# Altium PCB V3.2_Board.PcbDoc (part 6 of 9)
Units mil, origin at the board's own origin, x right, y up, seen from the top; angles counter-clockwise.
Board outline 7795.28 x 4881.89 mil, 2 copper layers (Top Layer, Bottom Layer), stack 57 mil thick; 419 components, 273 nets, 1244 pads, 414 vias.
Unrouted connection lines stored in the file: 3.
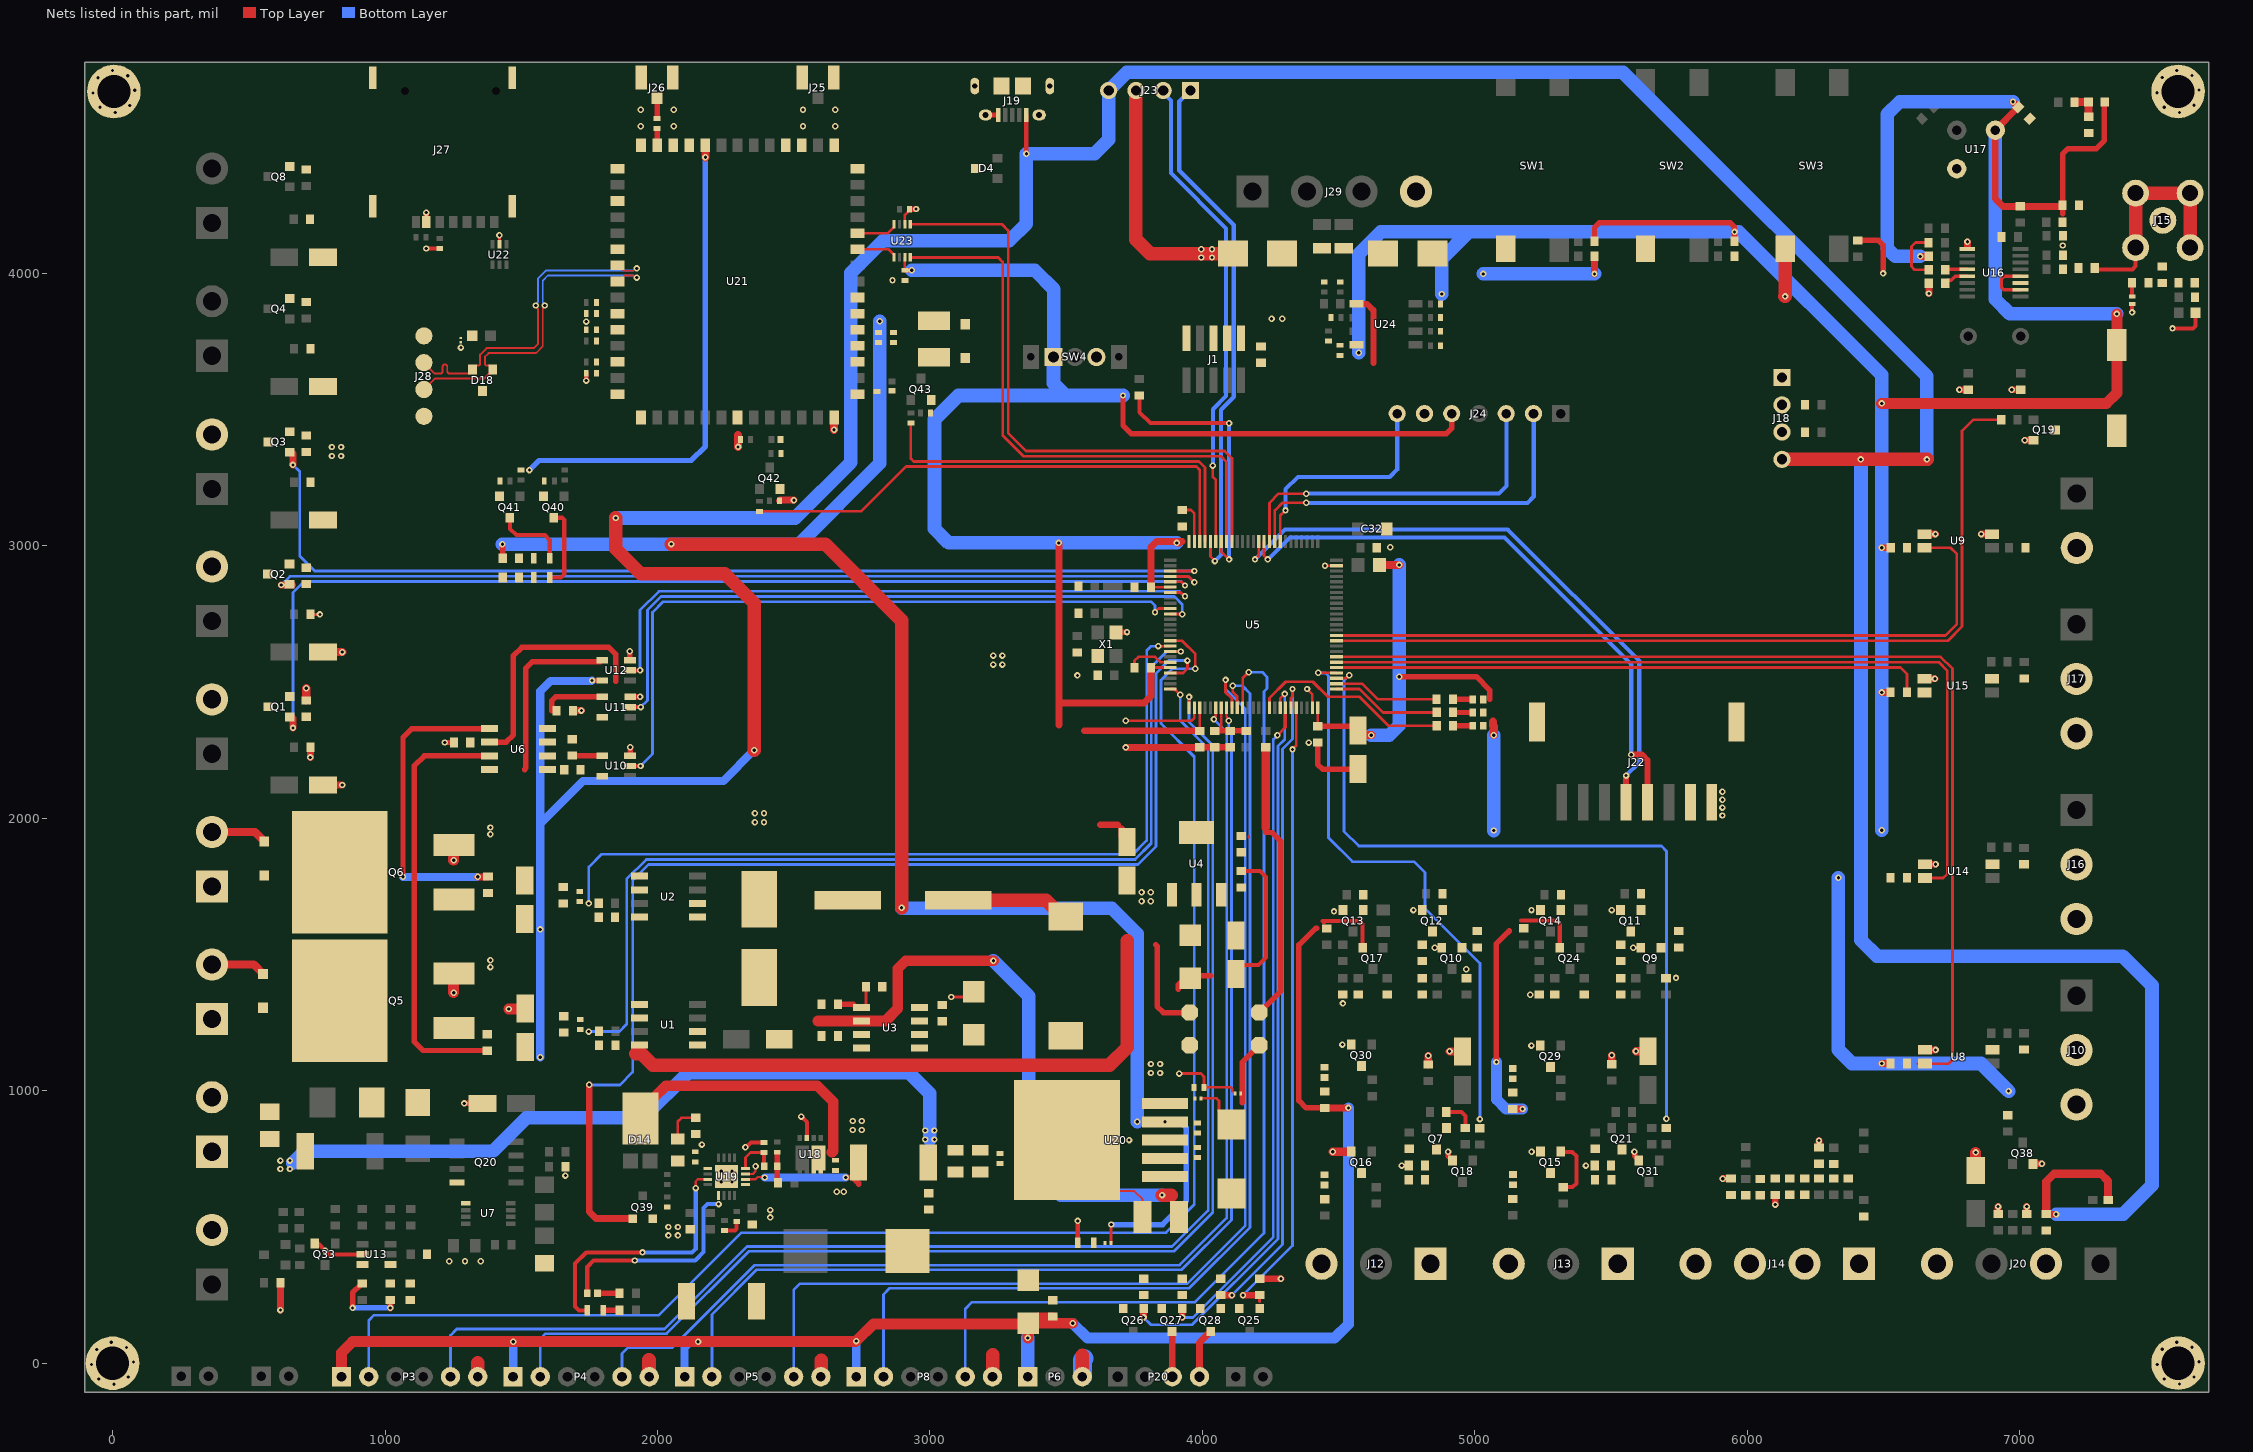
[diagram p3: the nets of this part, all layers, seen from the top]

## Part data (continued)
U6: "IC GATE DRVR LOW-SIDE 8SOIC", Case/Package=SOIC, Manufacturer="ON Semiconductor", Max Operating Temperature=140°C, Max Output Current=5A, Max Supply Current=3mA, Max Supply Voltage=20V, Min Operating Temperature=-40°C, Min Supply Voltage=4.5V, Supplier Part Number 1=NCP81071ADR2GOSDKR-ND, Category="Gate Drivers", Channel Type=Independent, ComponentLink1Description=https://datasheet.ciiva.com/48511/ncp81071-d-48511319.pdf?src-supplier=Avnet, ComponentLink1URL=https://datasheet.ciiva.com/48511/ncp81071-d-48511319.pdf?src-supplier=Avnet, Height=1.5mm, Lead Free="Lead Free", Length=5mm, Manufacturer Part Number=NCP81071ADR2G, Mount="Surface Mount", Number of Drivers=2, Number of Outputs=2, Number of Pins=8, Packaging="Cut Tape", Pricing 1="1=1.40000, 10=1.25100, 25=1.18720, 100=0.97520, 250=0.91160, 500=0.80560, 1000=0.70000 (USD)", REACH SVHC="No SVHC", RoHS=Yes, RoHS Compliant=Yes, Supplier 1=Digi-Key, Width=4mm
U7: "IC OR CTRLR N+1 8MSOP", Case/Package=MSOP, Manufacturer="Analog Devices / Linear Technology", Max Operating Temperature=70°C, Max Output Current=180mA, Max Supply Voltage=80V, Min Operating Temperature=0°C, Min Supply Voltage=4V, Operating Supply Current=150uA, Package Quantity=50, Supplier Part Number 1=584-LTC4359CMS8#PBF, Category="Power Management ICs", ComponentLink1Description=https://datasheet.ciiva.com/6609/4359fb-6609306.pdf?src-supplier=Digi-Key, ComponentLink1URL=https://datasheet.ciiva.com/6609/4359fb-6609306.pdf?src-supplier=Digi-Key, Lead Free="Lead Free", Manufacturer Part Number=LTC4359CMS8#PBF, Number of Drivers=1, Number of Pins=8, Packaging=Rail/Tube, Pricing 1="1=4.95000, 10=4.44000, 50=4.19000, 100=3.63000, 1000=3.09000, 10000=3.09000 (USD)", RoHS=Yes, Stock 1=57, Supplier 1=Mouser, Turn-Off Delay Time=300ns, Turn-On Delay Time=200us
U8 U9 U14 U15: "TransistorOptocouplers DC 1 2500Vrms SOP-4_P1.27 Optocouplers RoHS", Case/Package=SOIC, Collector Emitter Saturation Voltage=300mV, Forward Voltage=1.2V, Manufacturer=CEL, Max Collector Current=30mA, Max Operating Temperature=100°C, Max Output Voltage=80V, Max Power Dissipation=120mW, Min Operating Temperature=-55°C, Package Quantity=1, Supplier Part Number 1=PS2801C-1-F3-ACT-ND, Collector Emitter Voltage (VCEO)=300mV, ComponentLink1Description=http://www.cel.com/pdf/datasheets/PS2801C-1,PS2801C-4.pdf?src-supplier=Digi-Key, ComponentLink1URL=http://www.cel.com/pdf/datasheets/PS2801C-1,PS2801C-4.pdf?src-supplier=Digi-Key, ComponentLink2Description=http://www.cel.com/pdf/datasheets/how_to_order_optos.pdf?src-supplier=Digi-Key, ComponentLink2URL=http://www.cel.com/pdf/datasheets/how_to_order_optos.pdf?src-supplier=Digi-Key, ComponentLink3Description=http://datasheet.iiic.cc/cel/PS2801C-1-F3-A.pdf?src-supplier=IIIC, ComponentLink3URL=http://datasheet.iiic.cc/cel/PS2801C-1-F3-A.pdf?src-supplier=IIIC, Lead Free="Lead Free", Manufacturer Part Number=PS2801C-1-F3-A, Mount="Surface Mount", Number of Channels=1, Number of Pins=4, Output Current per Channel=30mA, Packaging="Tape and Reel", Pricing 1="1=0.77, 10=0.595, 100=0.3825 (USD)", Stock 1=399, Supplier 1=Digi-Key
U10 U11 U12: "IC BUF NON-INVERT 5.5V SOT23-5", Case/Package=SOT-23-5, High Level Output Current=-8mA, Low Level Output Current=8mA, Manufacturer="Texas Instruments", Max Operating Temperature=125°C, Max Supply Voltage=5.5V, Min Operating Temperature=-40°C, Min Supply Voltage=1.6V, Package Quantity=3000, Quiescent Current=1uA, Supplier Part Number 1=296-37176-6-ND, ComponentLink1Description=http://www.ti.com/lit/pdf/sdyu001?src-supplier=Digi-Key, ComponentLink1URL=http://www.ti.com/lit/pdf/sdyu001?src-supplier=Digi-Key, ComponentLink2Description=http://www.ti.com/lit/ds/symlink/sn74lv1t34.pdf?src-supplier=Avnet, ComponentLink2URL=http://www.ti.com/lit/ds/symlink/sn74lv1t34.pdf?src-supplier=Avnet, Lead Free="Lead Free", Logic Function=Buffer,Inverting, Manufacturer Part Number=SN74LV1T34DBVR, Mount="Surface Mount", Number of Bits=1, Number of Bits per Element=1, Number of Channels=1, Number of Elements=1, Number of Input Lines=1, Number of Inputs=1, Number of Output Lines=1, Number of Outputs=1, Number of Pins=5, Operating Supply Current=8mA, Packaging="Tape and Reel", Polarity=Non-Inverting, Pricing 1="1=0.43, 10=0.349, 25=0.3192, 100=0.2374, 250=0.2152, 500=0.17808, 1000=0.13356 (USD)", Propagation Delay=15.5ns, Radiation Hardening=No, REACH SVHC="No SVHC", RoHS Compliant=Yes, Stock 1=37360, Supplier 1=Digi-Key, Weight=0.000353oz
U13: "SOT-23-6 Comparators ROHS", Case/Package=SOT, Manufacturer="Texas Instruments", Max Operating Temperature=125°C, Max Supply Voltage=18V, Min Operating Temperature=-40°C, Min Supply Voltage=1.8V, Nominal Supply Current=7uA, Number of Voltages Monitored=2, Operating Supply Current=5.5uA, Package Quantity=3000, Quiescent Current=11uA, Supplier Part Number 1=595-TPS3700DDCR, Undervoltage Threshold=1.7V, Category=Comparators, ComponentLink1Description=https://datasheet.ciiva.com/15106/getdatasheetpartid-496993-15106246.pdf?src-supplier=Verical, ComponentLink1URL=https://datasheet.ciiva.com/15106/getdatasheetpartid-496993-15106246.pdf?src-supplier=Verical, ComponentLink2Description=https://datasheet.ciiva.com/22693/1882693-22693543.pdf?src-supplier=Element14, ComponentLink2URL=https://datasheet.ciiva.com/22693/1882693-22693543.pdf?src-supplier=Element14, ComponentLink3Description=https://datasheet.ciiva.com/6625/tps3700-6625126.pdf?src-supplier=Digi-Key, ComponentLink3URL=https://datasheet.ciiva.com/6625/tps3700-6625126.pdf?src-supplier=Digi-Key, ComponentLink4Description=https://datasheet.ciiva.com/6625/tps3700-6625125.pdf?src-supplier=Digi-Key, ComponentLink4URL=https://datasheet.ciiva.com/6625/tps3700-6625125.pdf?src-supplier=Digi-Key, ComponentLink5Description=https://datasheet.ciiva.com/6625/tps3700-6625129.pdf?src-supplier=Digi-Key, ComponentLink5URL=https://datasheet.ciiva.com/6625/tps3700-6625129.pdf?src-supplier=Digi-Key, ComponentLink6Description=https://datasheet.ciiva.com/14204/tps3700-14204199.pdf?src-supplier=Avnet, ComponentLink6URL=https://datasheet.ciiva.com/14204/tps3700-14204199.pdf?src-supplier=Avnet, Hysteresis=5.5mV, Lead Free="Lead Free", Manufacturer Part Number=TPS3700DDCR, Mount="Surface Mount", Number of Channels=1, Number of Elements=2, Number of Pins=6, Packaging="Tape and Reel", Pricing 1="1=2.75000, 10=2.48000, 25=2.34000, 50=2.34000, 100=2.00000, 250=1.87000, 500=1.64000, 1000=1.36000, 3000=1.35000, 10000=1.35000 (USD)", Propagation Delay=29us, Radiation Hardening=No, REACH SVHC="No SVHC", RoHS=Yes, RoHS Compliant=Yes, Series=TPS3700, Supplier 1=Mouser, Supply Current=7uA, Watchdog Timer=No
U16: "RF RX ASK/OOK 300-450MHZ 16QSOP", Case/Package=QSOP, Current - Receiving=6mA, Frequency=450MHz, Manufacturer=Microchip, Max Operating Temperature=105°C, Max Supply Voltage=3.6V, Min Frequency=300MHz, Min Operating Temperature=-40°C, Min Supply Voltage=3V, Nominal Supply Current=4.3mA, Operating Frequency="300 MHz to 450 MHz", Package Quantity=98, Bandwidth=330kHz, Category="Interface ICs", ComponentLink1Description=https://datasheet.ciiva.com/2798/micrf220-2798468.pdf?src-supplier=Digi-Key, ComponentLink1URL=https://datasheet.ciiva.com/2798/micrf220-2798468.pdf?src-supplier=Digi-Key, ComponentLink2Description=https://datasheet.ciiva.com/30475/0900766b81133813-30475820.pdf?src-supplier=RSComponents, ComponentLink2URL=https://datasheet.ciiva.com/30475/0900766b81133813-30475820.pdf?src-supplier=RSComponents, ComponentLink3Description=https://datasheet.ciiva.com/1164/micrf220-1164232.pdf?src-supplier=Element14, ComponentLink3URL=https://datasheet.ciiva.com/1164/micrf220-1164232.pdf?src-supplier=Element14, Data Rate=20Kbps, Depth=3.91mm, Height=1.47mm, Lead Free="Lead Free", Length=4.9mm, Manufacturer Part Number=MICRF220AYQS, Max Frequency=450MHz, Mount="Surface Mount", Number of Pins=16, Packaging=Rail/Tube, Pricing 1="1=2.15000 (USD)", Radiation Hardening=No, REACH SVHC="No SVHC", RoHS=Yes, RoHS Compliant=Yes, Sensitivity=-112.5dBm, Series=QwikRadio®, Stock 1=5131, Supplier 1="Arrow Electronics", Supplier Part Number 1=MICRF220AYQS, Supply Current=4.3mA, Width=3.91mm
U17: "Through Hole Biometric Sensors ROHS", Manufacturer=Senba, ComponentLink1Description=LCSC, ComponentLink1URL=https://www.lcsc.com/product-detail/Biometric-Sensors_Senba-Sensing-Tech-AS312_C90465.html, Manufacturer Part Number=AS312
U18: "40V 20A 17mΩ@10V,10A 21W 1.6V@250uA 72pF@20V 2 N-Channel 1.05nF@20V 11nC@10V +150℃@(Tj) PDFN3x3", Manufacturer="ALLPOWER(ShenZhen Quan Li Semiconductor)", ComponentLink1Description=LCSC, ComponentLink1URL=https://lcsc.com/product-detail/MOSFETs_ALLPOWER-ShenZhen-Quan-Li-Semiconductor-AP4008QD_C2828588.html, Manufacturer Part Number=AP4008QD
U19: "IC BATT CHG MULTI-CHEM 16VQFN", LCSC Part Number=C53712, Manufacturer="Texas Instruments", Category="Battery Management", ComponentLink1Description=https://datasheet.ciiva.com/15115/getdatasheetpartid-517726-15115144.pdf?src-supplier=Verical, ComponentLink1URL=https://datasheet.ciiva.com/15115/getdatasheetpartid-517726-15115144.pdf?src-supplier=Verical, ComponentLink2Description=https://datasheet.ciiva.com/1934/bq24650-1934895.pdf?src-supplier=Digi-Key, ComponentLink2URL=https://datasheet.ciiva.com/1934/bq24650-1934895.pdf?src-supplier=Digi-Key, ComponentLink3Description=https://datasheet.ciiva.com/3214/bq24650-3214319.pdf?src-supplier=Avnet, ComponentLink3URL=https://datasheet.ciiva.com/3214/bq24650-3214319.pdf?src-supplier=Avnet, Item Type=IC, Manufacturer Part Number=BQ24650RVAR, Pricing 1="1=4.95, 10=4.442, 25=4.1996, 100=3.6396, 250=3.453, 500=3.09836, 1000=2.61307 (USD)", RoHS=Yes, Stock 1=8347, Supplier 1=Digi-Key
U20: "IC REG LDO ADJ 3A TO263-5", Case/Package=TO-263, Dropout Voltage=370mV, Input Bias Current=40nA, LCSC Part Number=C11149, Manufacturer=Microchip, Max Input Voltage=26V, Max Operating Temperature=125°C, Max Output Current=3A, Max Output Voltage=25V, Min Input Voltage=2.5V, Min Operating Temperature=-40°C, Min Output Voltage=1.25V, Package Quantity=750, Quiescent Current=35mA, Reference Voltage=1.24V, Supplier Part Number 1=3153683, Accuracy=1%, Category="Voltage Regulators - Linear", ComponentLink1Description=https://datasheet.ciiva.com/23772/1572633-23772885.pdf?src-supplier=Newark, ComponentLink1URL=https://datasheet.ciiva.com/23772/1572633-23772885.pdf?src-supplier=Newark, ComponentLink2Description=https://datasheet.ciiva.com/16296/mic29150-16296190.pdf?src-supplier=Future+Electronics, ComponentLink2URL=https://datasheet.ciiva.com/16296/mic29150-16296190.pdf?src-supplier=Future+Electronics, ComponentLink3Description=https://datasheet.ciiva.com/15200/getdatasheetpartid-143209-15200663.pdf?src-supplier=Verical, ComponentLink3URL=https://datasheet.ciiva.com/15200/getdatasheetpartid-143209-15200663.pdf?src-supplier=Verical, Height=4.59mm, Item Type=IC, Lead Free="Lead Free", Length=10.67mm, Manufacturer Part Number=MIC29302WU-TR, Mount="Surface Mount", Number of Outputs=1, Number of Pins=5, Number of Regulators=1, Output Configuration=Positive, Output Current=3A, Output Type=Adjustable, Output Voltage=26V, Packaging="Tape and Reel", Polarity=Positive, Pricing 1="750=2.12000, 1500=2.09000, 2250=2.07000, 3000=2.06000, 3750=2.02000 (USD)", Radiation Hardening=No, Reach SVHC Compliant=Yes, RoHS=Yes, RoHS Compliant=Yes, Series=-, Supplier 1="Future Electronics", Width=9.17mm
U21: "SMD,30x30mm 2G/3G/4G/5G Modules ROHS", LCSC Part Number=C126259, Manufacturer=SIMCom, Package=SMD,30x30mm, ComponentLink1Description=LCSC, ComponentLink1URL=https://www.lcsc.com/product-detail/2G-3G-4G-5G-Modules_SIMCom-Wireless-Solutions-SIM7500E_C126259.html, Item Type=IC, Manufacturer Part Number=SIM7500E
U22: "15V 5 Unidirectional 5V SOT-363 ESD Protection Devices ROHS", LCSC Part Number=C5180312, Manufacturer=ElecSuper, Package=SOT-363, ComponentLink1Description=LCSC, ComponentLink1URL=https://www.lcsc.com/product-detail/ESD-Protection-Devices_ElecSuper-SMF05CT1G-ES_C5180312.html, Item Type="ESD Diode", Manufacturer Part Number=SMF05CT1G-ES
U23: "IC TRNSLTR BIDIRECTIONAL US8", Case/Package=VSSOP, High Level Output Current=-20uA, LCSC Part Number=C2677366, Low Level Output Current=20uA, Manufacturer="Texas Instruments", Max Operating Temperature=85°C, Max Supply Voltage=5.5V, Min Operating Temperature=-40°C, Min Supply Voltage=1.65V, Output Current=50mA, Package Quantity=1, Category="Integrated Circuits (ICs)", ComponentLink1Description=https://datasheet.ciiva.com/4226/sces641b-4226901.pdf?src-supplier=Arrow+Electronics, ComponentLink1URL=https://datasheet.ciiva.com/4226/sces641b-4226901.pdf?src-supplier=Arrow+Electronics, ComponentLink2Description=https://datasheet.ciiva.com/15096/getdatasheetpartid-226009-15096242.pdf?src-supplier=Verical, ComponentLink2URL=https://datasheet.ciiva.com/15096/getdatasheetpartid-226009-15096242.pdf?src-supplier=Verical, ComponentLink3Description=https://datasheet.ciiva.com/14287/txb0102-14287498.pdf?src-supplier=Avnet, ComponentLink3URL=https://datasheet.ciiva.com/14287/txb0102-14287498.pdf?src-supplier=Avnet, ComponentLink4Description=https://datasheet.ciiva.com/14287/txb0102-14287370.pdf?src-supplier=Avnet, ComponentLink4URL=https://datasheet.ciiva.com/14287/txb0102-14287370.pdf?src-supplier=Avnet, ComponentLink5Description=https://datasheet.ciiva.com/6619/txb0102-6619255.pdf?src-supplier=Digi-Key, ComponentLink5URL=https://datasheet.ciiva.com/6619/txb0102-6619255.pdf?src-supplier=Digi-Key, ComponentLink6Description=https://datasheet.ciiva.com/6619/txb0102-6619256.pdf?src-supplier=Digi-Key, ComponentLink6URL=https://datasheet.ciiva.com/6619/txb0102-6619256.pdf?src-supplier=Digi-Key, ComponentLink7Description=https://datasheet.ciiva.com/6619/txb0102-6619257.pdf?src-supplier=Digi-Key, ComponentLink7URL=https://datasheet.ciiva.com/6619/txb0102-6619257.pdf?src-supplier=Digi-Key, Contact Plating=Gold, Data Rate=100Mbps, Height=0.85mm, Item Type=IC, Lead Free="Lead Free", Length=2.3mm, Logic Function=Translator, Manufacturer Part Number=TXB0102DCUT, Mount="Surface Mount", Number of Bits=2, Number of Channels=2, Number of Inputs=2, Number of Pins=8, Output Type=3-STATE, Packaging="Tape and Reel", Pricing 1="1=0.79330, 10=0.66470, 25=0.65820, 250=0.37450, 500=0.36200, 1000=0.29770, 2500=0.28440 (USD)", Propagation Delay=31ns, Radiation Hardening=No, REACH SVHC="No SVHC", RoHS=Yes, RoHS Compliant=Yes, Series=-, Stock 1=10, Supplier 1="Arrow Electronics", Supplier Part Number 1=TXB0102DCUT, Turn-On Delay Time=7.4ns, Weight=0.000339oz, Width=2mm
U24: "SOP-8 RS-485/RS-422 ICs ROHS", LCSC Part Number=C519086, Manufacturer=HGSEMI, Package=SOP-8, ComponentLink1Description=LCSC, ComponentLink1URL=https://www.lcsc.com/product-detail/RS-485-RS-422-ICs_HGSEMI-SP3485EIM-TR_C519086.html, Item Type=IC, Manufacturer Part Number=SP3485EIM/TR
X1: library part XC32M4-8.000-F18LJDT, "8MHz SMD Crystal Resonator 18pF 200Ω ±20ppm ±30ppm -40℃~+85℃ SMD3225-4P Crystals ROHS", Manufacturer=HCI, ComponentLink1Description=LCSC, ComponentLink1URL=https://www.lcsc.com/product-detail/Crystals_HCI-XC32M4-8-000-F18LJDT_C2905353.html, Manufacturer Part Number=XC32M4-8.000-F18LJDT
X2: library part S1C13523ZWFAC, "13.52313MHz In-line passive crystal oscillator 20pF 60Ω ±20ppm ±30ppm -40℃~+85℃ HC-49S-2P Crystals ROHS", LCSC Part Number=C2681243, Manufacturer=JYJE, Package=HC-49S-2P, ComponentLink1Description=LCSC, ComponentLink1URL=https://www.lcsc.com/product-detail/Crystals_JYJE-S1C13523ZWFAC_C2681243.html, Manufacturer Part Number=S1C13523ZWFAC
X3: library part X321532768KGD2SI, "32.768kHz SMD Crystal Resonator 12.5pF ±20ppm -40℃~+85℃ SMD3215-2P Crystals ROHS", Manufacturer="Yangxing Tech", ComponentLink1Description=LCSC, ComponentLink1URL=https://www.lcsc.com/product-detail/Crystals_Yangxing-Tech-X321532768KGD2SI_C620155.html, Manufacturer Part Number=X321532768KGD2SI

## Free pads (board coordinates)
  round 196.85 hole 122.05: MH1(0,0) MH1(4.98,4667.25) MH1(7580.92,4667.53) MH1(7580.92,0.24)

## Via types
v1: diameter 23.62, hole 11.81, Top Layer to Bottom Layer, 414 vias

## Nets (pads, with @x,y where several pads share a name; then routed paths per layer and width w, separated by ;. In a path a pad name is that pad's centre, name@x,y a point inside that pad or via, vN(x,y) a via of type N, cw(c..) or ccw(c..) an arc to the next point about the centre after c; other vN are vias at no path point)
0-10V: R112.1 SB36.1
3V3: C5.2 C23.1 C26.1 C27.1 C28.1 C29.1 C30.1 C31.1 C39.1 C48.1 C49.1 C51.1 C52.1 C75.2 C76.1 C104.1 D3.2 J1.1 J24.5 L1.1 LED1.1 LED2.1 LED3.1 LED8.1 LS1.1 P1.1 P3.1 P4.1 P5.1 P6.1 P8.1 Q17.2 Q24.2 R18.2 R19.2 R20.2 R23.2 R31.2 R35.2 R43.2 R45.2 R48.2 R49.2 R54.2 R55.2 R57.2 R58.2 R59.2 R60.2 R76.2 R79.2 R93.2 R94.2 R104.2 R106.1 SW4.1 U4.2 U4.4 U5.6 U5.21 U5.28 U5.50 U5.100 U17.1 U23.7 U24.8 | length 28019.1
  Top Layer w10: C104.1@2907.95,4011.35 U23.7@2907.95,4058.34 ; P6.1@3359.25,-49.47 P6.1@3360.11,-48.61 ; C28.1@3811,2553.04 U5.21@3881.86,2553.04 ; C30.1@3811,2848.32 U5.6@3881.86,2848.32 ; C29.1@3990.13,2320.85 U5.28@3990.13,2405.4 ; 4169.71,1930.28 4169.71,1933.67 ; C27.1@4423.2,2337.85 U5.50@4423.2,2405.4 ; R94.2@4448.92,937 R94.2@4449.92,938 ; L1.1@4650.37,2929.74 L1.1@4650.63,2930 ; C76.1@6994.1,4609.55 C76.1@6995.33,4609.55
  Top Layer w15: C104.1@2907.95,4011.35 v1(2933.54,4011.35) ; 4446.61,1617.5 4441.12,1623 4576.42,1623 4588.14,1611.28 Q17.2@4588.14,1524.89 ; 5170.07,1624.21 5298.67,1624.21 5311.6,1611.28 Q24.2@5311.6,1524.89
  Top Layer w20: v1(3708.52,3551.49) 3708.52,3441.48 3738.46,3411.54 4895.23,3411.54 4915,3431.31 J24.5@4915,3485 ; P1.1@4209,1287 4288,1366 4288,1915.39 4255.69,1947.69 4232.5,1947.69 ; 4419.53,1596 4415,1596 4354,1535 4354,964 4381,937 R94.2@4448.92,937 ; C27.1@4423.2,2337.85 C31.1@4571,2337.85 ; v1(4722.69,2519.58) 5005.42,2519.58 5054.2,2470.8 5054.2,2436.13 ; v1(5078.94,1105.37) 5078.94,1539.94 5120.28,1581.28 5122,1581.28 5125.69,1584.97 5125.69,1586.69 ; R18.2@5439.05,4117.27 5439.05,4168.05 5456,4185 5938,4185 5952.41,4170.59 R19.2@5952.41,4117.27 ; R23.2@6525.57,2461.72 R23.2@6528.44,2461.72 ; v1@6975,4629.33 v1(6975,4630) ; 7157,4218.21 R54.2@7157,4245.5 ; R54.2@7157,4249 7157,4437.94 7177.06,4458 7280.5,4458 7310,4487.5 LED8.1@7310,4625
  Top Layer w25: 3473.15,2342 v1@3473.15,3010.24 ; 3487.8,2423 3786,2423 3811,2448 C28.1@3811,2553.04 ; 3567,2320.85 C29.1@3990.13,2320.85 ; 3625,1976 3689.61,1976 ; C23.1@3704.26,1961.36 3704.26,1932.26 C23.1@3723.25,1913.26 ; C30.1@3811,2848.32 3811,2995.06 3831.58,3015.64 3926.31,3015.64 ; v1(3905.48,3010.6) v1@3916,3010.6 ; R94.2@4449.92,938 4450.92,937 v1(4536,937) ; R93.2@5139,933 v1(5175,933) ; v1(6492.97,1099.89) R76.2@6525.57,1099.89 ; v1(6492.97,2461.72) R23.2@6525.57,2461.72 ; v1(6493,2992.89) R79.2@6526.36,2992.89 ; v1(6634.66,4062) R55.2@6666,4062 ; v1@6975,4629.33 C76.1@6994.1,4610.23 ; C76.1@6993.93,4609.53 6910.11,4525.71 U17.1@6910.11,4525.36 6910.11,4273.37 6937.98,4245.5 R54.2@7157,4245.5
  Top Layer w30: D3.2@3395.66,171 C52.1@3452.5,171 ; C52.1@3452.5,159.83 C52.1@3452.5,170.99 ; 4232.25,1965 R31.2@4232.25,2260.85 ; C31.1@4571,2321.87 4571,2321.5 4587.5,2305 v1(4620,2305) ; L1.1@4650.63,2930 v1(4722.69,2930) ; 5066.4,2354.17 5066.4,2340 5069,2337.4 v1(5069,2305)
  Top Layer w40: P3.1@840.25,-49.47 840.25,38.25 881,79 v1(1471,79) v1(2149,79) 2727.5,79 v1(2729.5,81) 2792.5,144 D3.2@3359.25,144 ; v1(3359.25,93) D3.2@3359.25,144 ; D3.2@3360.11,146.62 3360.11,144 D3.2@3359.25,144 ; D3.2@3394.12,146.62 v1(3523.82,146.62) ; v1(6493,3522.38) 7317.42,3522.38 7356,3560.96 LS1.1@7356,3736.96 v1(7356,3851)
  Bottom Layer w30: P4.1@1471,-48.47 v1(1471,79) ; P5.1@2099.75,-49.47 2099.75,57.31 2121.44,79 v1(2149,79) ; P8.1@2729.5,-49.47 v1(2729.5,81)
  Bottom Layer w40: v1(3523.82,146.62) 3578.44,92 4484.94,92 4535.94,143 4535.94,936.94 v1(4536,937) ; v1(5078.94,1105.37) 5078.94,968.51 5114.45,933 v1(5175,933)
  Bottom Layer w50: v1(2933.54,4011.35) 3384.65,4011.35 3455,3941 SW4.1@3455,3694.48 ; P6.1@3359.25,-49.47 v1(3359.25,93) ; SW4.1@3453.52,3693 3453.52,3596.77 3498.8,3551.49 ; v1(3473.12,3010.6) 3068.44,3010.6 3016.59,3062.46 3016.59,3463.46 3104.62,3551.49 3498.8,3551.49 ; v1@3473.83,3010.6 v1(3905.48,3010.6) ; v1(3708.52,3551.49) 3498.8,3551.49 ; v1(4574,3708.52) 4574,4071.21 4654.79,4152 4977,4152 ; v1(4620,2305) 4686,2305 4722.69,2341.69 v1(4722.69,2519.58) ; v1@4722.69,2525.88 v1(4722.69,2930) ; v1(4878,3924) 4878,4053 4977,4152 ; v1(5069,1955) v1(5069,2305) ; v1(6334,1782) 6334,1150 6384.11,1099.89 v1(6492.97,1099.89) 6857.39,1099.89 v1(6958.74,998.54) ; v1(6492.97,1956.11) v1@6492.97,2459.67 ; v1(6492.97,2461.72) 6492.97,3626.8 5967.78,4152 v1(5953,4152) 4977,4152 ; v1@6633.69,4062.97 6633.42,4062.69 6631.41,4062.69 6631.13,4062.97 6542.29,4062.97 6513,4092.26 6513,4584 6559,4630 v1(6975,4630) ; U17.1@6910.11,4525.36 6910.11,3904.89 6964,3851 v1(7356,3851)
  other v1: 4254,3833 4293.2,3833
3V3#: C50.1 R54.1 SB17.1
4-20mA: R103.1 R110.1 SB35.1
5V: C4.1 C6.1 C16.1 C17.1 C18.1 C21.1 C22.1 C55.1 D2.1 J18.4 J19.1 J23.4 L2.2 P7.1 R1.1 R21.2 R85.2 SB43.1 U1.8 U2.8 U4.3 U6.6 U10.5 U11.5 U12.5 | length 19705.9
  Top Layer w10: R21.2@7097.11,547.36 R21.2@7097.47,547
  Top Layer w16: v1@3353.7,4439.7 J19.1@3353.7,4581.04
  Top Layer w20: U6.6@1399.72,2279.17 1444.17,2279.17 1471,2306 1471,2596.68 1501.94,2627.62 1821.38,2627.62 1846.71,2602.29 1846.71,2502.44 ; v1(1760,2505.63) U12.5@1797.23,2505.63 ; 3829,1535 3834,1530 3834,1310 3857,1287 P7.1@3953,1287
  Top Layer w25: R21.2@7097.47,547 v1(7133,547)
  Top Layer w30: R21.2@7097.11,547.36 7097.11,667.23 7125.2,695.32 7297.04,695.32 7324.11,668.25 SB43.1@7324.11,599.36
  Top Layer w50: v1(1847.05,3102.05) 1847.05,2988.95 1939,2897 2247.31,2897 2355,2789.31 v1(2355,2250) ; 1921,1136.36 1940.55,1136.36 1982.91,1094 3659,1094 3724,1159 3724,1551 ; C16.1@3103.67,1699.36 3425.8,1699.36 3486.3,1638.87 L2.2@3498.11,1638.87 ; J18.4@6127.47,3317 v1(6416,3317) v1(6658.91,3317) v1@6660,3317
  Bottom Layer w30: v1(1570,1123) v1(1570,1592) 1570,1980 ; v1(1760,2505.63) 1758.37,2504 1607,2504 1570,2467 1570,1980 ; v1(2355,2250) 2242,2137 1727,2137 1570,1980
  Bottom Layer w50: v1(1847.05,3102.05) 2505.05,3102.05 2709,3306 2709,4001 2827.36,4119.36 3291.36,4119.36 3354,4182 v1(3354,4439) 3603.73,4439 3656,4491.27 J23.4@3656,4665.04 ; J23.4@3656,4671 3722.5,4737.5 5543.5,4737.5 6658.91,3622.09 v1(6658.91,3317) ; v1@6417.09,3317 6417.09,1552.25 6475.34,1494 7377,1494 7485,1386 7485,653 7379,547 v1(7133,547)
_ADC: C36.1 R12.2 R13.2 U5.32 | length 202.8
  Top Layer w8: 4068.87,2325.7 U5.32@4068.87,2405.4
  Top Layer w10: 4068.87,2325.7 4073.72,2320.85
  Top Layer w20: C36.1@4045.11,2320.85 4073.72,2320.85 R13.2@4102.33,2320.85 R12.2@4161.39,2320.85
ADC_14: P4.2 U5.26 | length 4766.8
  Top Layer w10: U5.26@3950.76,2405.4 3950.98,2405.62 3950.98,2445.12 v1(3951.19,2445.34)
  Bottom Layer w10: P4.2@1570,-49.47 1570,89 1589.31,108.31 2033.19,108.31 2335.88,411 3895.21,411 4038,553.79 4038,2266.48 3951,2353.48 3951,2445.14 v1(3951.19,2445.34)
ADC_15: P4.5 U5.31 | length 4407
  Top Layer w10: v1@4041,2363 v1@4041,2365.63 ; v1(4042.06,2363) 4047.95,2373.77 ccw(c4039.18,2378.59) 4049.18,2378.59 U5.31@4049.18,2405.4 U5.31@4049,2405.22
  Bottom Layer w10: P4.5@1870,-49.47 1870,36 1891.31,57.31 2054.31,57.31 2357,360 3916.33,360 4089,532.67 4089,2316.06 v1(4042.06,2363)
ADJ: R130.1 R133.2 U20.5
AGND: C86.1 Q39.2 R124.2 R125.1 R129.1 R148.1 U19.17 | length 74.4
  Top Layer w15: C86.1@2245.76,486.64 2283.82,486.64 2290.79,493.61 R129.1@2290.79,520.14
  other v1: 2040,469 2075,469 2040,500 2075,500
AN1: P8.2 U5.35 | length 3870.4
  Top Layer w10: v1(4111.68,2486.22) 4111.68,2463 4127.92,2446.76 U5.35@4127.92,2405.4
  Bottom Layer w10: P8.2@2829.5,-49.47 2829.5,252.37 2852.14,275 3951.54,275 4174.35,497.81 4174.35,2457.99 4146.12,2486.22 v1(4111.68,2486.22)
AN2: P8.5 U5.36 | length 3721.1
  Top Layer w10: U5.36@4147.61,2405.4 4147.61,2513.82 v1(4169.98,2536.19)
  Bottom Layer w10: P8.5@3129.5,-49.47 3129.5,199.67 3153.83,224 3972.67,224 4226,477.33 4226,2464.62 4237.23,2475.86 4237.23,2518.46 4219.5,2536.19 v1(4169.98,2536.19)
AN10: P3.2 U5.16 | length 5696.6
  Top Layer w10: U5.16@3881.86,2651.47 3925.14,2651.47 3973.88,2602.73 v1(3973.88,2549)
  Bottom Layer w10: P3.2@940.25,-49.47 940.25,157.25 959.31,176.31 2005.02,176.31 2307.71,479 3867.04,479 3970,581.96 3970,2225.73 3848.14,2347.59 3848.14,2506.41 3890.73,2549 v1(3973.88,2549)
AN11: P3.5 U5.25 | length 5103.9
  Top Layer w10: U5.25@3881.86,2474.3 3899.58,2474.3 3900.48,2473.39 3900.48,2470.92 v1(3918.37,2453.03)
  Bottom Layer w10: P3.5@1240.25,-49.47 1240.25,102.25 1263.31,125.31 2026.15,125.31 2328.83,428 3888.17,428 4021,560.83 4021,2256.16 3918.56,2358.6 3918.56,2452.85 v1(3918.37,2453.03)
AN12: P5.2 U5.33 | length 4163.9
  Top Layer w8: U5.33@4088.55,2405.4 4088.55,2376.04 ccw(c4098.55,2376.04) 4089.64,2371.51 ; 4089.65,2371.48 v1(4096.54,2358)
  Bottom Layer w10: P5.2@2199.75,-49.47 2199.75,178.71 2364.04,343 3923.37,343 4106.35,525.98 4106.35,2322.75 4096.54,2332.56 v1(4096.54,2358)
AN13: P5.5 U5.34 | length 4218.9
  Top Layer w10: v1(4084.87,2507.76) v1(4084.87,2507.76) 4084.83,2462.4 4108.24,2439 U5.34@4108.24,2405.4
  Bottom Layer w10: P5.5@2499.75,-49.47 2499.75,269.18 2522.58,292 3944.5,292 4157.35,504.85 4157.35,2401.73 4084.87,2474.21 v1(4084.87,2507.76)
ANT: C74.1 L3.1 U16.3 | length 50.1
  Top Layer w12: C74.1@7412,3965 C74.1@7412.44,3964.56
  Top Layer w15: L3.1@7412.44,3915.04 C74.1@7412.44,3964.56
ANT#: C74.2 SB4.1 SB16.2
AUTO_FILL: J5.2 Q1.3
AUTO_FLUSH: J6.2 Q2.3
AUX_HEATER: C60.2 J13.1 Q21.3 R67.1 SB8.2
B_CNTRL: Q28.1 R75.1 U5.45 | length 2430.6
  Top Layer w10: R75.1@4067.23,250 4069.09,248.15 R75.1@4070.59,249.65 ; U5.45@4324.77,2405.4 4324.77,2440.97 4330.68,2446.88 v1(4330.68,2474.3)
  Top Layer w25: R75.1@4070.59,249.65 v1(4108.35,249.65)
  Bottom Layer w10: v1(4108.35,249.65) 4294.27,435.57 4294.27,2254.28 4330.68,2290.68 v1(4330.68,2474.3)
B_GND: P20.4 Q28.3 | length 182.3
  Top Layer w25: P20.4@3989.25,-49.47 3989.25,75.14 4026.58,112.47 4026.58,112.96 4029.34,115.72 Q28.3@4029.83,115.72
BAT: C2.2 C83.2 C84.2 C85.2 C87.2 J2.1 R120.1 R127.2 R149.2 U19.9 | length 2676.6
  Bottom Layer w50: 661.21,734.77 661.21,735.21 662,736 662.43,736 704.43,778 1396,778 1519.12,901.12 1948.12,901.12 2114.02,1067.02 2922.01,1067.02 2999,990.03 2999,854 2999,821
  other v1: 2414,535 2414,562 616.21,712.77 651.21,712.77 616.21,743.77 651.21,743.77 2983,821 3016.5,821 2983,854 3016.5,854
BOOT0: R16.2 U5.94 | length 985.3
  Top Layer w10: U5.94@4068.87,3015.64 4068.87,2979.13 v1(4098,2950)
  Top Layer w15: R16.2@3769,3552 3769,3490 3808.96,3450.04 v1(4098,3450.04)
  Bottom Layer w15: v1(4098,2950) v1(4098,3450.04)
BUZZER: R62.2 U5.60 | length 3196.1
  Top Layer w10: U5.60@4492.1,2651.47 6735.74,2651.47 6788,2703.72 6788,3421.84 6828.56,3462.4 R62.2@6931.61,3462.4
CE: Q39.1 U5.22 | length 4358.2
  Top Layer w10: U5.22@3881.86,2533.35 3929.21,2533.35 3944.85,2549 v1(3944.85,2578.63)
  Top Layer w25: v1(1749.89,1021.89) 1749.89,555.64 1774.69,530.85 Q39.1@1907.64,530.85
  Bottom Layer w10: v1(1749.89,1021.89) 1750.78,1021 1862,1021 1909,1068 1909,1772 1967,1830 3762.82,1830 3829.26,1896.45 3829.26,2531.41 3876.48,2578.63 v1(3944.85,2578.63)
CII: R1.2 R2.2 U3.5 | length 178.7
  Top Layer w10: U3.5@2748.52,1306.27 2757.2,1306.27 2765,1314.06 R1.2@2765,1382
  Top Layer w20: R2.2@2662.11,1317.36 2718.73,1317.36 2729.82,1306.27 U3.5@2748.52,1306.27
CRNT_SNS.IP+_1: D25.2 J3.2 U1.1 U1.2 | length 202
  Top Layer w30: J3.2@365.05,1462.98 518.48,1462.98 552.11,1429.35 D25.2@552.11,1428.37
  other v1: 1387,1454 1387,1479
CRNT_SNS.IP+_2: D26.2 J4.2 U2.1 U2.2 | length 207.4
  Top Layer w30: J4.2@365.05,1950.03 522.43,1950.03 557.11,1915.35 D26.2@557.11,1914.37
  other v1: 1387,1941.05 1387,1966.05
CRNT_VOUT.VIOUT1: C11.1 R5.2 R7.1 U5.18 | length 3480.4
  Top Layer w10: U5.18@3881.86,2612.09 v1(3920.63,2612.09)
  Bottom Layer w10: v1(1748,1217) 1860,1217 1887,1244 1887,1776.87 1959.13,1849 3753.03,1849 3812.26,1908.23 3812.26,2555.25 3869.11,2612.09 v1(3920.63,2612.09)
CRNT_VOUT.VIOUT2: C19.1 R8.2 R10.1 U5.17 | length 3011.5
  Top Layer w10: v1(3838,2631.78) U5.17@3881.86,2631.78
  Bottom Layer w10: v1(1748,1687.47) 1748,1821.67 1794.33,1868 3744.88,1868 3795.26,1918.38 3795.26,2614.71 3812.34,2631.78 v1(3838,2631.78)
DRV_OUTA1: R24.2 U6.7 | length 1585.2
  Top Layer w20: R24.2@1375.39,1147.61 1139.73,1147.61 1107,1180.34 1107,1345 1107,2192 1144.17,2229.17 U6.7@1383.22,2229.17
DRV_OUTB1: R25.2 U6.5 | length 1155.8
  Top Layer w10: R25.2@1377,1785 R25.2@1378,1786
  Top Layer w20: v1(1066,1785) 1066,2297 1098.17,2329.17 U6.5@1383.22,2329.17 U6.5@1383.82,2329.77
  Top Layer w25: v1(1340,1785) R25.2@1377,1785
  Bottom Layer w30: v1(1066,1785) v1(1340,1785)
ENA: U5.7 U12.2 | length 2353.2
  Top Layer w10: U5.7@3881.86,2828.63 3920.48,2828.63 3934.26,2814.85 v1(3936,2814.85)
  Top Layer w15: U12.2@1899.6,2543.03 v1(1936.19,2543.03)
  Bottom Layer w10: v1(1936.19,2543.03) 1936.19,2763.77 2005.42,2833 3916.23,2833 3934.38,2814.85 v1(3936,2814.85)
ENA#: R85.1 U6.1 U6.8 U12.4 | length 657.7
  Top Layer w20: 1512.33,2178.17 1517,2186 1517,2551.5 1539.5,2574 U12.4@1790.8,2574
FILL_CNTRL: Q1.1 R69.1 U5.5 | length 3889.1
  Top Layer w10: U5.5@3881.86,2868 3923.33,2868 3936,2855.33 v1(3936,2854.22)
  Top Layer w25: v1(662.32,2331.61) Q1.1@662.32,2367.13
  Bottom Layer w10: v1(662.32,2331.61) 662.32,2828.32 702.65,2868.65 3921.57,2868.65 v1(3936,2854.22)
FLOW_MCU1: R76.1 U5.57 U8.4 | length 3846.5
  Top Layer w10: U5.57@4492.1,2592.41 6709.51,2592.41 6753,2548.92 6753,1113.77 6738.23,1099 6651.35,1099 U8.4@6626.64,1099
FLOW_MCU2: R35.1 U5.56 U14.4 | length 3063.3
  Top Layer w10: U5.56@4492.1,2572.72 6702.32,2572.72 6734,2541.05 6734,1796.2 6718.69,1780.89 6676.94,1780.89
FLOW_MCU3: R23.1 U5.55 U15.4 | length 2171.1
  Top Layer w10: U5.55@4492.1,2553.04 6561.97,2553.04 6585.57,2529.43 R23.1@6585.57,2461.72 ; U15.4@6649.56,2461.72 U15.4@6649.67,2461.83
FLOW_OUT1: J10.2 R77.1 U8.2
FLOW_OUT2: J16.2 R36.1 U14.2
FLOW_OUT3: J17.2 R38.1 U15.2
FLUSH_CNTRL: Q2.1 R70.1 U5.4 | length 3515.9
  Top Layer w10: U5.4@3881.86,2887.69 3948.57,2887.69 v1(3970.44,2865.82)
  Top Layer w20: v1(619,2856) v1@619.23,2856.23 ; Q2.1@660.06,2856.23 660.15,2856.31 Q2.1@662.32,2854.13
  Top Layer w25: v1@619.23,2856.23 Q2.1@660.06,2856.23
  Bottom Layer w10: v1(619,2856) 651,2888 3948.26,2888 v1(3970.44,2865.82)
G_CNTRL: Q27.1 R74.1 U5.44 | length 2454.1
  Top Layer w10: Q27.1@3923,198.13 Q27.1@3925.73,200.86 ; v1(4275.32,2304.53) 4305.09,2334.3 U5.44@4305.09,2405.4
  Top Layer w25: v1(3925.73,168) Q27.1@3925.73,200.86
  Bottom Layer w10: v1(3925.73,168) 3964.75,168 4260.27,463.52 4260.27,2289.48 v1(4275.32,2304.53)
G_GND: P20.3 Q27.3 | length 166.1
  Top Layer w25: Q27.3@3888.33,116.21 3889.25,115.29 P20.3@3889.25,-49.47
GATE: Q20.4 U7.1
GATE_DRV.INA_1: U5.10 U10.2 | length 2573.7
  Top Layer w10: v1(3826,2756.02) 3826,2756.91 3838.67,2769.58 U5.10@3881.86,2769.58
  Top Layer w15: U10.2@1899.6,2191.81 v1(1938,2191.81)
  Bottom Layer w10: v1(1938,2191.81) 1982,2235.81 1982,2755.84 2021.16,2795 3812,2795 3826,2781 v1(3826,2756.02)
GATE_DRV.INB_1: U5.11 U11.2 | length 2480.5
  Top Layer w10: U5.11@3881.86,2749.89 3925.11,2749.89 v1(3926.02,2748.98)
  Top Layer w15: U11.2@1900,2408.17 v1(1938.41,2408.17)
  Bottom Layer w10: v1(1938.41,2408.17) 1963,2432.76 1963,2763.71 2013.29,2814 3896.9,2814 3926.02,2784.89 v1(3926.02,2748.98)
GND: C1.2 C2.1 C3.2 C4.2 C5.1 C6.2 C9.2 C11.2 C16.2 C17.2 C18.2 C19.2 C20.1 C21.2 C22.2 C23.2 C24.2 C25.2 C26.2 C27.2 C28.2 C29.2 C30.2 C31.2 C32.2 C33.2 C34.1 C35.1 C36.2 C37.1 C38.1 C39.2 C40.2 C41.1 C42.2 C43.2 C44.1 C45.2 C46.2 C47.2 C48.2 C49.2 C50.2 C51.2 C52.2 C53.1 C54.2 C55.2 C57.1 C58.2 C59.2 C60.1 C61.2 C62.2 C63.2 C64.2 C65.2 C66.2 C67.2 C68.2 C69.2 C70.2 C71.1 C72.1 C73.1 C76.2 C78.1 C79.1 C80.2 C81.1 C83.1 C84.1 C85.1 C88.1 C89.2 C90.1 C91.2 C93.2 C94.1 C95.1 C96.1 C97.1 C98.1 C99.2 C100.1 C101.2 C102.1 C103.2 C104.2 D1.2 D2.2 D3.1 D4.3 D5.1 D8.1 D12.2 D13.1 D16.2 D17.1 D18.3 D19.2 J1.3 J1.5 J1.9 J2.2 J10.3 J12.3 J13.3 J14.3 J14.4 J15.2 J15.3 J15.4 J15.5 J16.3 J17.3 J18.1 J19.5 J19.MH1 J19.MH2 J19.MH3 J19.MH4 J19.MP1 J19.MP2 J20.4 J21.2 J22.1 J22.2 J22.MP1 J22.MP2 J23.3 J24.6 J25.2 J25.3 J26.2 J26.3 J27.1 J27.2 J27.3 J27.4 J27.C5 J28.4 J29.4 L3.2 L4.2 LED11.2 P3.6 P4.6 P5.6 P6.3 P8.6 P10.1 pad.MH1 Q1.2 Q2.2 Q3.2 Q4.2 Q5.2 Q6.2 Q8.2 Q9.2 Q10.2 Q11.2 Q12.2 Q13.2 Q14.2 Q15.2 Q16.2 Q18.2 Q19.2 Q25.2 Q26.2 Q27.2 Q28.2 Q29.2 Q30.2 Q31.2 Q33.2 Q38.2 Q40.2 Q41.2 Q42.2 Q43.2 R2.1 R4.2 R6.2 R7.2 R9.2 R10.2 R13.1 R26.2 R32.2 R34.2 R53.1 R61.2 R65.1 R66.1 R67.2 R69.2 R70.2 R72.2 R73.2 R74.2 R75.2 R83.2 R84.2 R86.1 R88.1 R91.1 R92.1 R97.2 R98.2 R103.2 R105.1 R113.1 R131.1 R133.1 R139.1 R142.1 R145.1 R147.1 R148.2 SB6.2 SB41.2 SB42.2 SW1.1 SW2.1 SW3.1 SW4.3 U1.5 U1.6 U2.5 U2.6 U3.4 U4.1 U5.20 U5.27 U5.49 U5.74 U5.99 U6.3 U8.3 U9.2 U9.3 U10.3 U11.3 U12.3 U13.2 U14.3 U15.3 U16.2 U16.4 U16.9 U17.3 U18.3 U19.11 U20.3 U20.6 U21.1 U21.3 U21.6 U21.15 U21.16 U21.22 U21.28 U21.29 U21.31 U21.32 U21.35 U21.43 U21.44 U21.46 U21.47 U21.53 U21.54 U21.56 U22.2 U23.2 U24.5 X1.2 X1.4 | length 9481.3
  Top Layer w7: U20.6@3502.69,818.99 3690.18,631.5 3749.97,631.5 3780.4,601.07 3780.4,600.12 3779.93,599.66 C91.2@3779.93,536.12
  Top Layer w8: U19.11@2322.67,694.64 2350.33,694.64 2360,704.31 v1(2360,723)
  Top Layer w10: C64.2@726,2748 v1(761,2748) ; Q5.2@1252,1428.86 Q5.2@1253.66,1430.52 ; Q6.2@1252,1899.88 Q6.2@1253.66,1901.53 ; U22.2@1420,4107.19 v1(1420,4140) ; C4.2@1512.3,1300 C4.2@1514.64,1302.34 ; U10.3@1899.6,2229.22 U10.3@1900,2229.62 ; U12.3@1899.6,2580.43 U12.3@1900.08,2580.91 ; U11.3@1900,2445.57 U11.3@1900.08,2445.65 ; C80.2@2390.84,810.66 C80.2@2391,810.5 ; C16.2@2602.11,1669.91 2631.56,1699.36 C16.2@2698.55,1699.36 ; U21.28@2648,3469.88 U21.28@2648.25,3470.13 ; U23.2@2907.95,4180.39 2907.95,4213.86 2925.45,4231.36 C103.2@2925.45,4234.86 C103.2@2926.02,4235.43 ; v1@2948.43,4235.43 v1(2949,4236) ; v1(3078,1344) 3141.26,1344 D1.2@3160,1362.74 ; LED11.2@3542.47,442 LED11.2@3542.74,442.26 ; X1.4@3682.58,2681.67 X1.4@3684.27,2683.36 ; v1(3719,2358) 3960.04,2358 3970.44,2368.41 U5.27@3970.44,2405.4 ; C28.2@3751,2553.04 3751,2578.63 3764.78,2592.41 3826,2592.41 3845.69,2572.72 U5.20@3881.86,2572.72 ; v1(3915,1063) 3994.19,1063 4005.86,1051.33 R133.1@4005.86,1015.21 ; C39.2@3926.31,3131 3958.16,3131 3970.44,3118.71 U5.99@3970.44,3015.64 ; R133.1@4006.02,1012.28 4103.95,1012.28 4109.81,1006.43 4109.81,997.91 ; v1(4384,2474.3) 4403.51,2454.78 U5.49@4403.51,2405.4 ; v1(4450,2927.06) U5.74@4492.1,2927.06 ; Q16.2@4546.49,776.26 Q16.2@4546.6,776.37 ; C59.2@4828.77,1096 C59.2@4829,1096.23 ; SW1.1@5113.13,4090.4 SW1.1@5115,4088.53 ; C45.2@5502,1098 C45.2@5503,1097 ; SW3.1@6138.69,4090.4 SW3.1@6139,4090.09 ; SB41.2@6660,4119.96 6665,4114.96 SB41.2@6665,4113 6617.33,4113 6602.33,4098 6602.33,4024.77 6614.43,4012.67 C54.2@6666,4012.67 ; C70.2@6666,3963 C70.2@6666.5,3962.5 ; D12.2@6837.89,706.85 D12.2@6838,706.74 ; C40.2@6920.13,548 C40.2@6920.13,548 ; R66.1@7025.01,548.11 R66.1@7025.13,548 ; Q38.2@7048.4,731.63 Q38.2@7048.51,731.74
  Top Layer w12: U16.2@7002.44,3939.5 6941,3939.5 6933,3947.5 6933,3979.94 6942.56,3989.5 U16.4@7002.44,3989.5
  Top Layer w15: Q33.2@742.37,438.97 742.37,437 757.39,437 766.31,428.08 766.31,426.32 793.02,399.6 U13.2@916.95,399.6 ; v1(1151.06,4091.08) C101.2@1201.06,4091.08 ; C98.1@1738.61,3633.52 1738.71,3633.42 1738.71,3606.32 v1(1738.81,3606.22) ; v1(2322.67,792.64) 2325.01,792.64 2342.87,810.5 2386,810.5 2386.16,810.66 C80.2@2390.84,810.66 ; v1(2527.68,905.07) 2548.29,884.46 U18.3@2548.29,826.64 ; LED11.2@3542.74,442.26 3542.6,442.4 3542.6,522.15 v1(3542.74,522.28) ; C21.2@4121.94,1401.45 4121.94,1430.13 4153.81,1462 4206,1462 4233,1489 4233,1785 4211.64,1806.36 C22.2@4143.11,1806.36 ; C50.2@7275,4014.56 7413.39,4014.56 7425.11,4026.27 J15.4@7425.11,4094.36 ; L3.2@7410.98,3887.1 7411.35,3887.48 L3.2@7412.44,3887.48 ; v1(7411.98,3856.49) L3.2@7411.98,3887.1 ; v1(7560.24,3797.67) 7635.71,3797.67 7644.49,3806.45 L4.2@7644.49,3856
  Top Layer w20: J27.C5@1151.06,4187.87 v1(1151.06,4223) ; v1(1219,2278) C55.2@1253,2278 ; v1(1291.05,953.36) C1.2@1357.38,953.36 ; v1(1898,2613) 1898.69,2612.31 1898.69,2582.24 1900.02,2580.91 U12.3@1900.08,2580.91 ; U10.3@1900,2229.62 v1(1900,2261.03) ; U11.3@1900.08,2445.65 1936.11,2445.65 v1(1936.19,2445.72) ; C103.2@2926.02,4235.43 v1@2948.43,4235.43 ; J19.MH2@3204.1,4581.04 J19.5@3243.07,4581.04 ; X1.4@3684.27,2683.36 v1(3723.19,2683.36) ; 3910.61,1372.08 3910.61,1388.31 3923.99,1401.69 3940.23,1401.69 3940.23,1408 3953.61,1421.38 4030.96,1421.38 ; C27.2@4423.2,2277.85 4423.2,2197.8 4440.87,2180.13 C31.2@4571,2180.13 ; v1(4901.46,776.35) 4902.15,775.65 4902.15,761.11 4917.6,745.66 Q18.2@4917.6,743.69 ; v1(5585.46,776.35) 5586.15,775.65 5586.15,761.11 5601.6,745.66 Q31.2@5601.6,743.69 ; C73.1@6405,4121 6481,4121 6497.98,4104.02 v1(6497.98,3999.73)
  Top Layer w22: U24.5@4565.91,3886.32 U24.5@4564.75,3887.48 4604.47,3887.48 4627,3864.95 4627,3670.49
  Top Layer w25: R34.2@616,295 616.16,294.84 v1(616.16,195) ; v1(726,2223.5) C62.2@726,2261 ; C61.2@771.87,2122.04 v1(843.05,2122.04) ; R84.2@1690,2395 v1(1721,2395) ; R145.1@2448.25,3165.5 2450.25,3167.5 v1(2500.89,3167.5) ; v1(3719,2260) 3989.28,2260 C29.2@3990.13,2260.85 C36.2@4045.11,2260.85 R13.1@4102.33,2260.85 ; R72.2@4210.64,310 v1(4288,310) ; v1(5439.05,3998) C37.1@5439.05,4062.36 ; v1(5910,677.36) C42.2@5940,677.36 ; v1(6102.16,582) R103.2@6102.16,617.36 ; C79.1@6263,792 v1(6263,817) ; U15.3@6649.56,2511.72 6649.67,2511.83 v1(6688.19,2511.83) ; U9.3@6650.35,3042.89 6650.46,3043 v1(6690,3043) ; U8.3@6651.35,1149.89 6651.46,1150 v1(6691,1150) ; U14.3@6651.35,1830.89 6651.46,1831 v1(6691,1831) ; v1(6666.5,3925.84) C70.2@6666.5,3962.5 ; v1(6778.41,3573) C72.1@6811.06,3573 ; 6807.56,4096.39 v1(6807.56,4115.83) ; v1(6858.72,3042.78) 6898.27,3042.78 U9.2@6898.38,3042.89 ; C40.2@6920.13,548 v1(6920.09,574.72) ; v1(6970.41,3573) C71.1@7003.06,3573 ; v1(7017.98,3387.49) 7050.52,3387.49 Q19.2@7050.63,3387.6 ; R66.1@7025.01,548.11 v1(7025.01,574.72) ; Q38.2@7048.51,731.74 v1(7081.06,731.74)
  Top Layer w28: C59.2@4829,1096.23 v1(4829,1128) ; C45.2@5502,1098 v1(5502,1130)
  Top Layer w30: R69.2@711,2432.52 v1(711,2476.96) ; C63.2@771.87,2610 v1(843.05,2610) ; v1(2295.92,3362.82) 2295.92,3406.7 ; v1(2648,3426) U21.28@2648,3469.88 ; v1(4478,776.37) 4546.38,776.37 Q16.2@4546.49,776.26 ; v1@4908,1143.87 C58.2@4955,1143.87 ; v1(5591,1144.87) C43.2@5635.5,1144.87
  Top Layer w40: v1(1252,1360) Q5.2@1252,1428.86 ; v1(1252,1846) Q6.2@1252,1899.88 ; v1(1454,1300) C4.2@1512.3,1300 ; D12.2@6837.89,706.85 v1(6837.89,773.65)
  Top Layer w50: P3.6@1340.25,-49.47 1340.27,0.53 ; 1969,12 1969,-48.46 P4.6@1970,-49.47 ; P5.6@2599.75,-49.47 2601,-48.22 2601,11 ; P8.6@3229.5,-49.47 3230,-48.97 3230,31 ; 3559,29 3559,-49.21 P6.3@3559.25,-49.47 ; J23.3@3756,4671 3756,4124 3807.48,4072.52 3930.96,4072.52 ; 3941,4072.52 D5.1@4111.45,4072.52 ; v1(6138.29,3915.29) 6138.29,3915.92 6138.69,3916.31 SW3.1@6138.69,4090.4 ; J15.4@7425.11,4094.36 J15.3@7425.11,4294.36 J15.2@7625.11,4294.36 J15.5@7625.11,4094.36
  Bottom Layer w50: v1(5031,3998) v1(5439.05,3998)
  Bottom Layer w70: P6.3@3559.25,-49.47 3559.42,-49.3 3559.42,11.42 3565,17
  other v1: 5,-77.16 7586.08,-76.76 -50.91,-58.15 7530.17,-57.75 57.98,-51.08 7639.07,-50.67 -77,-5.16 7504.08,-4.76 77,4.84 7658.08,5.24 -57.98,50.75 7523.1,51.15 50.91,57.82 7632,58.22 -5,76.84 7576.08,77.24 1235.93,374.12 1293.52,374.12 1351.11,374.12 780.35,412.94 2657.69,629.39 2683.61,629.39 1662,688.52 4731.65,725.47 5407.35,725.47 5207.94,776.26 2163.02,802.36 3731,819 2716.43,855.83 2749.93,855.83 2716.43,888.83 2749.93,888.83 3811,1065 3844.5,1065 3811,1098 3844.5,1098 4907,1144.87 5207.54,1165.89 4513.94,1169.48 4515.71,1320.35 5203.35,1351.89 5738.19,1414 4968.13,1445.65 4852.65,1524.78 5580.94,1524.78 4482.94,1658.02 4774.31,1663.02 5207.68,1663.02 5501.94,1663.02 3776.75,1695.53 3810.25,1695.53 3776.75,1728.53 3810.25,1728.53 2357.5,1985 2391,1985 5908.3,2010.14 2357.5,2018 2391,2018 5908.3,2039.07 5908.3,2068 5908.3,2096.93 4390.55,2277.74 3541.11,2524.36 3232.5,2564 3266,2564 3232.5,2597 3266,2597 4689,2995 805.34,3329.52 838.84,3329.52 805.34,3362.52 838.84,3362.52 1278.73,3727.56 1738.61,3823 2862.68,3974.35 3996,4058 4035.2,4058 3996,4088 4035.2,4088 7157.83,4102 1938.45,4540 2059.56,4540 2534,4540 2652.11,4540 9.82,4590.25 7585.92,4590.7 1938.45,4600 2059.56,4600 2534,4600 2652.11,4600 -46.09,4609.26 7530.01,4609.72 62.8,4616.33 7638.9,4616.79 -72.18,4662.25 7503.92,4662.7 81.82,4672.25 7657.92,4672.7 -53.16,4718.16 7522.94,4718.61 55.73,4725.23 7631.83,4725.68 -0.18,4744.25 7575.92,4744.7
GND_DRV_1: D25.1 J3.1 Q5.3
GND_DRV_2: D26.1 J4.1 Q6.3
GNSS_ANT: C92.2 J26.1 | length 70.1
  Top Layer w20: C92.2@1998.65,4571.95 J26.1@1998.65,4642.01
GSM_BUCK_EN: C9.1 C90.2 C91.1 D11.1 R3.2 U3.6 U20.1 U20.2 | length 2183.8
  Top Layer w10: 3885.33,617 3888.09,619.77 3888.09,622.58
  Top Layer w40: 2588.83,1256.57 U3.6@2748.52,1256.57 ; U3.6@2760.02,1256.57 2836.77,1256.57 2882,1301.81 2882,1447.67 2911.33,1477 v1(3233,1477)
  Top Layer w50: v1(3852,617) 3885.33,617
  Bottom Layer w50: v1(3233,1477) 3362.61,1347.39 3362.61,734.39 3480,617 v1(3852,617)
GSM_PWR: C88.2 C89.1 C93.1 C94.2 C95.2 D13.2 P9.1 R130.2 R131.2 R132.2 R137.1 R140.1 U20.4 U21.33 U21.34 | length 6915.1
  Top Layer w10: R132.2@3664.83,442 v1@3664.83,508.28 ; R130.2@3994.19,972.12 4052.24,972.12 4061.27,963.09 4061.27,921.71 4067.84,915.14 4067.84,901 4077.03,891.81 4091.18,891.81 C89.1@4106.86,876.12 4106.86,880.45 C89.1@4152.45,926.04
  Top Layer w20: v1(1431,3006) 1431.5,3005.5 1431.5,2954.5 R140.1@1432,2954 ; 4146.51,956.52 4146.51,1104.64 P9.1@4209,1167.13
  Top Layer w50: v1(2050.35,3006.13) 2615.87,3006.13 2896,2726 v1(2896,1671.28)
  Bottom Layer w20: v1(3665.5,508.95) 3854.05,508.95 3940.72,595.62 3940.72,863.37 3918.17,885.92 v1(3862.72,885.92)
  Bottom Layer w50: v1(1431,3006) 2519,3006 2815.81,3302.81 v1(2815.81,3824) ; v1@2895.9,1671.18 2897.08,1670 3667,1670 3761,1576 v1(3761,885.92)
GSM_PWR_EN: R146.2 U5.97 | length 1495
  Top Layer w10: R146.2@2930,3450 2930,3320 2940.27,3309.73 3987.27,3309.73 4009.81,3287.19 U5.97@4009.81,3015.64
GSM_RST: R143.2 U5.98 | length 1951.6
  Top Layer w10: R143.2@2374.71,3126.5 2747.5,3126.5 2911.73,3290.73 3978.27,3290.73 3990.13,3278.87 U5.98@3990.13,3015.64
GSM_RX: U21.39 U23.4 | length 140.1
  Top Layer w10: U21.39@2734.87,4147.3 2845.34,4147.3 U23.4@2866.27,4168.23
GSM_TX: U21.38 U23.5 | length 136
  Top Layer w10: U21.38@2738.81,4088.24 2848.52,4088.24 U23.5@2867.11,4069.65
GSM_USB_D_N: D18.2 J28.2 U21.7 | length 1259.4
  Top Layer w7: J28.2@1142.73,3672.15 1182.94,3631.94 1199.52,3631.94 1203.02,3631.94 ccw(c1203.02,3640.44) 1211.52,3640.44 1211.52,3657.1 cw(c1220.02,3657.1) 1228.52,3657.1 1228.52,3640.44 ccw(c1237.02,3640.44) 1237.02,3631.94 1270.73,3631.94 1315.17,3631.94 D18.2@1320.6,3637.37 ; D18.2@1320.6,3646.37 1320.6,3648.34 1333.24,3660.98 1344.9,3660.98 1349,3665.08 1349,3701.88 1372.68,3725.56 1468.19,3725.56 1523.5,3725.56 1546.71,3725.56 1560.81,3739.65 1560.81,3869.69 1553,3877.5 v1(1553,3882) ; U21.7@1852.98,4029.19 1856.92,4029.19 1876.63,4009.48 1911.55,4009.48 1919.9,4017.83 v1(1924,4017.83)
  Bottom Layer w7: v1(1553,3882) 1553,3886.5 1560.81,3894.31 1560.81,3980.1 1590.73,4010.01 1911.69,4010.01 1919.5,4017.83 v1(1924,4017.83)
GSM_USB_D_P: D18.1 J28.3 U21.8 | length 1259.4
  Top Layer w7: J28.3@1142.73,3573.73 1182.94,3613.94 1363.76,3613.94 1381.58,3631.76 1389.79,3631.76 D18.1@1395.4,3637.37 ; D18.1@1395.4,3646.37 1395.4,3648.34 1382.76,3660.98 1371.1,3660.98 1367,3665.08 1367,3694.43 1380.13,3707.56 1554.17,3707.56 1578.81,3732.2 1578.81,3869.69 1586.62,3877.5 v1(1586.62,3882) ; U21.8@1852.98,3970.13 1856.92,3970.13 1878.26,3991.48 1912.25,3991.48 1919.53,3984.2 v1(1924.02,3984.2)
  Bottom Layer w7: v1(1586.62,3882) 1586.62,3886.5 1578.81,3894.31 1578.81,3972.64 1598.19,3992.01 1911.72,3992.01 1919.53,3984.2 v1(1924.02,3984.2)
HEAT_CNTRL: R33.1 U5.53 | length 2827.7
  Top Layer w10: U5.53@4492.1,2513.67 4492.26,2513.83 4526.6,2513.83 4537.99,2525.23 v1(4538.75,2525.23)
  Bottom Layer w10: v1(4538.75,2525.23) 4538.75,2524.81 4520,2506.06 4520,1952 4574.15,1897.85 5684.14,1897.85 5703,1879 v1(5703,897)
HEATER: C44.2 J12.1 Q7.3 R26.1 SB2.2 | length 2.1
  Top Layer w25: J12.1@4837.28,365 J12.1@4838.77,366.49
HMI_UART.RX_HMI: J22.4 U5.86 | length 2186.5
  Top Layer w10: U5.86@4226.35,3015.64 4226.35,2963.78 v1(4240.13,2950)
  Top Layer w22: v1(5574,2233.43) 5613.83,2233.43 5633.26,2214 5633.26,2058.26 J22.4@5633.52,2058
  Bottom Layer w15: v1(4240.13,2950) 4320.79,3030.66 5108.34,3030.66 5574,2565 v1(5574,2233.43)
HMI_UART.TX_HMI: J22.5 U5.87 | length 2266.6
  Top Layer w10: v1(4192.88,2950) 4206.66,2963.78 U5.87@4206.66,3015.64
  Top Layer w22: J22.5@5554.78,2058 v1(5554.78,2156.78)
  Bottom Layer w15: v1(4192.88,2950) 4302.88,3060 5120.49,3060 5603.34,2577.15 5603.34,2205.34 v1(5554.78,2156.78)
I2C_ENCODER.SCL: J23.2 U5.95 | length 1775.8
  Top Layer w10: v1(4038.19,3294.21) 4038.19,3252.81 4049.09,3241.91 4049.09,3015.73 U5.95@4049.18,3015.64
  Bottom Layer w15: J23.2@3856,4671 3856,4662.22 3883.98,4634.24 3883.98,4368.02 4087,4165 4087,3549.97 4038.19,3501.16 v1(4038.19,3294.21)
I2C_ENCODER.SDA: J23.1 U5.96 | length 1933.9
  Top Layer w10: U5.96@4029.5,3015.64 4029.5,2960.5 v1(4046,2944)
  Bottom Layer w15: J23.1@3956,4671 3915,4630 3915,4376.68 4115,4176.68 4115,3546.85 4067.5,3499.35 4067.5,2965.5 v1(4046,2944)
IN+: R11.1 R30.2 U13.3 | length 269.8
  Top Layer w10: R30.2@1019.27,232.43 R30.2@1019.27,232.43
  Top Layer w20: v1@881.17,205.42 881.17,259.14 909.45,287.43 911.95,287.43 R11.1@916.95,292.43
  Top Layer w25: v1(1019.31,203.12) R30.2@1019.27,232.43
  Bottom Layer w20: v1(881.17,203.12) v1@1018.33,203.12
IN-: R30.1 R32.1 U13.4
INA_1#: R83.1 U6.2 U10.4 | length 109.3
  Top Layer w20: R83.1@1687.93,2229.86 U10.4@1797.23,2229.86
INB_1#: R84.1 U6.4 U11.4 | length 228
  Top Layer w20: 1612,2395 1612,2431.63 1625.95,2445.57 U11.4@1797.64,2445.57
IND1: LED5.2 Q16.3
IND2: LED4.2 Q15.3
IND3: LED6.2 Q29.3
IND4: LED7.2 Q30.3
IO_A11: R15.1 U5.51 | length 403.5
  Top Layer w10: U5.51@4492.1,2474.3 4576.66,2474.3 4662.72,2388.23 R15.1@4859.99,2388.23
IO_A12: R17.1 U5.41 | length 741.5
  Top Layer w10: U5.41@4246.03,2405.4 4246.03,2441.21 4305.93,2501.11 4404.89,2501.11 4460.14,2445.86 4577.15,2445.86 4683.55,2339.47 R17.1@4859.99,2339.47
IO_C9: R28.1 U5.54 | length 2098.9
  Top Layer w10: v1(4425,2534) 4425.32,2533.68 4491.77,2533.68 U5.54@4492.1,2533.35
  Bottom Layer w10: v1(4425,2534) 4425.48,2533.52 4450.96,2533.52 4463,2521.48 4463,1928.39 4550.54,1840.85 4777.25,1840.85 4817,1801.1 4817,1669 5018.54,1467.46 v1(5018.54,896)
IO_C13: R14.1 U5.52 | length 391
  Top Layer w10: U5.52@4492.1,2493.98 4586.02,2493.98 4643,2437 R14.1@4859.49,2437
"IPK SNS": R3.1 U3.1 U3.7 U3.8
IRQ_NFC: J24.7 U5.83 | length 844.9
  Top Layer w10: U5.83@4285.4,3015.64 4285.4,3110.32 v1(4304.91,3129.83)
  Bottom Layer w15: v1(4304.91,3129.83) 4304.91,3207.64 4350.28,3253 4687.61,3253 4715,3280.39 J24.7@4715,3485
LED_SIG.R_CNTRL: Q26.1 R73.1 U5.43 | length 2736.1
  Top Layer w10: Q26.1@3784,200.63 Q26.1@3784.23,200.86 ; U5.43@4285.4,2405.4 4285.4,2439.52 v1(4302.24,2456.36)
  Top Layer w25: v1(3784,168) Q26.1@3784,200.63
  Bottom Layer w10: v1(3784,168) 3810.81,141.19 3961.98,141.19 4277.27,456.48 4277.27,2264.51 4302.24,2289.48 v1(4302.24,2456.36)
LED_SIG.W_LED_CNTRL: Q25.1 R72.1 U5.46 | length 2322.2
  Top Layer w10: 4210.64,225.05 4209.36,226.33 4209.36,248.72 R72.1@4210.64,250 ; v1(4330.68,2252.77) 4344.46,2266.55 U5.46@4344.46,2405.4
  Top Layer w25: v1(4148.96,249.65) R72.1@4208.44,249.65
  Bottom Layer w10: v1(4148.96,249.65) 4330.68,431.37 v1(4330.68,2252.77)
LEVEL_IN: J11.2 R80.2
LEVEL_MCU: R79.1 U5.61 U9.4 | length 2679.2
  Top Layer w10: U5.61@4492.1,2671.15 6727.11,2671.15 6768.98,2713.02 6768.98,2969.76 6745.85,2992.89 U9.4@6650.35,2992.89
MCU_RX: U5.93 U23.8 | length 2136.7
  Top Layer w10: U23.8@2927.64,4058.34 3250.66,4058.34 3267,4042 3267,3405.72 3343.98,3328.73 4067.56,3328.73 4088.55,3307.74 U5.93@4088.55,3015.64
MCU_TX: U5.92 U23.1 | length 2277.2
  Top Layer w10: U23.1@2927.64,4180.39 3263.61,4180.39 3287,4157 3287,3414 3353.27,3347.73 4081.63,3347.73 4108.24,3321.13 U5.92@4108.24,3015.64
MEM_CNTRL: Q3.1 R4.1 U5.3 | length 3782
  Top Layer w10: U5.3@3881.86,2907.37 v1(3970.44,2907.37)
  Top Layer w25: v1(662,3297) 662,3338.81 Q3.1@662.32,3339.13
  Bottom Layer w10: v1(662,3297) 687.07,3271.93 687.07,2962.49 742.18,2907.37 v1(3970.44,2907.37)
MEM_SAVER: J7.2 Q3.3
MISO_NFC: J24.2 U5.84 | length 1390.3
  Top Layer w10: U5.84@4265.72,3015.64 4265.72,3129.66 4293.92,3157.86 4380.76,3157.86 v1(4381,3157.62)
  Bottom Layer w15: v1(4381,3157.62) 5192.77,3157.62 5216,3180.85 5216,3484 J24.2@5215,3485
MOSI_NFC: J24.3 U5.85 | length 1303.5
  Top Layer w10: U5.85@4246.03,3015.64 4246.03,3157.39 4279.89,3191.24 v1(4381,3191.24)
  Bottom Layer w15: v1(4381,3191.24) 5088.02,3191.24 5116,3219.22 5116,3484 J24.3@5115,3485
NetC20_2: C20.2 U3.3
NetC41_2: C41.2 C57.2 D14.3 R119.1 U18.6 | length 1122.1
  Top Layer w10: R119.1@2074.88,822.64 2074.88,888.11 2087.4,900.64 C57.2@2139.88,900.64
  Top Layer w40: D14.3@1937.1,898.41 1937.1,927.94 1983.24,974.08 1986.32,974.08 2030.68,1018.44 2586.15,1018.44 2645.13,959.45 2645.13,778.17 2641.1,774.14
NetC42_1: C42.1 R110.2 R111.2
NetC54_1: C54.1 U16.12 | length 82.3